# Altium PCB Windmill_Circuit_v2.1.PcbDoc (part 2 of 2)
Units mil, origin at the board's own origin, x right, y up, seen from the top; angles counter-clockwise.
Board outline 6875 x 6875 mil, 2 copper layers (Top Layer, Bottom Layer), stack 61.811 mil thick; 69 components, 43 nets, 209 pads, 194 vias.
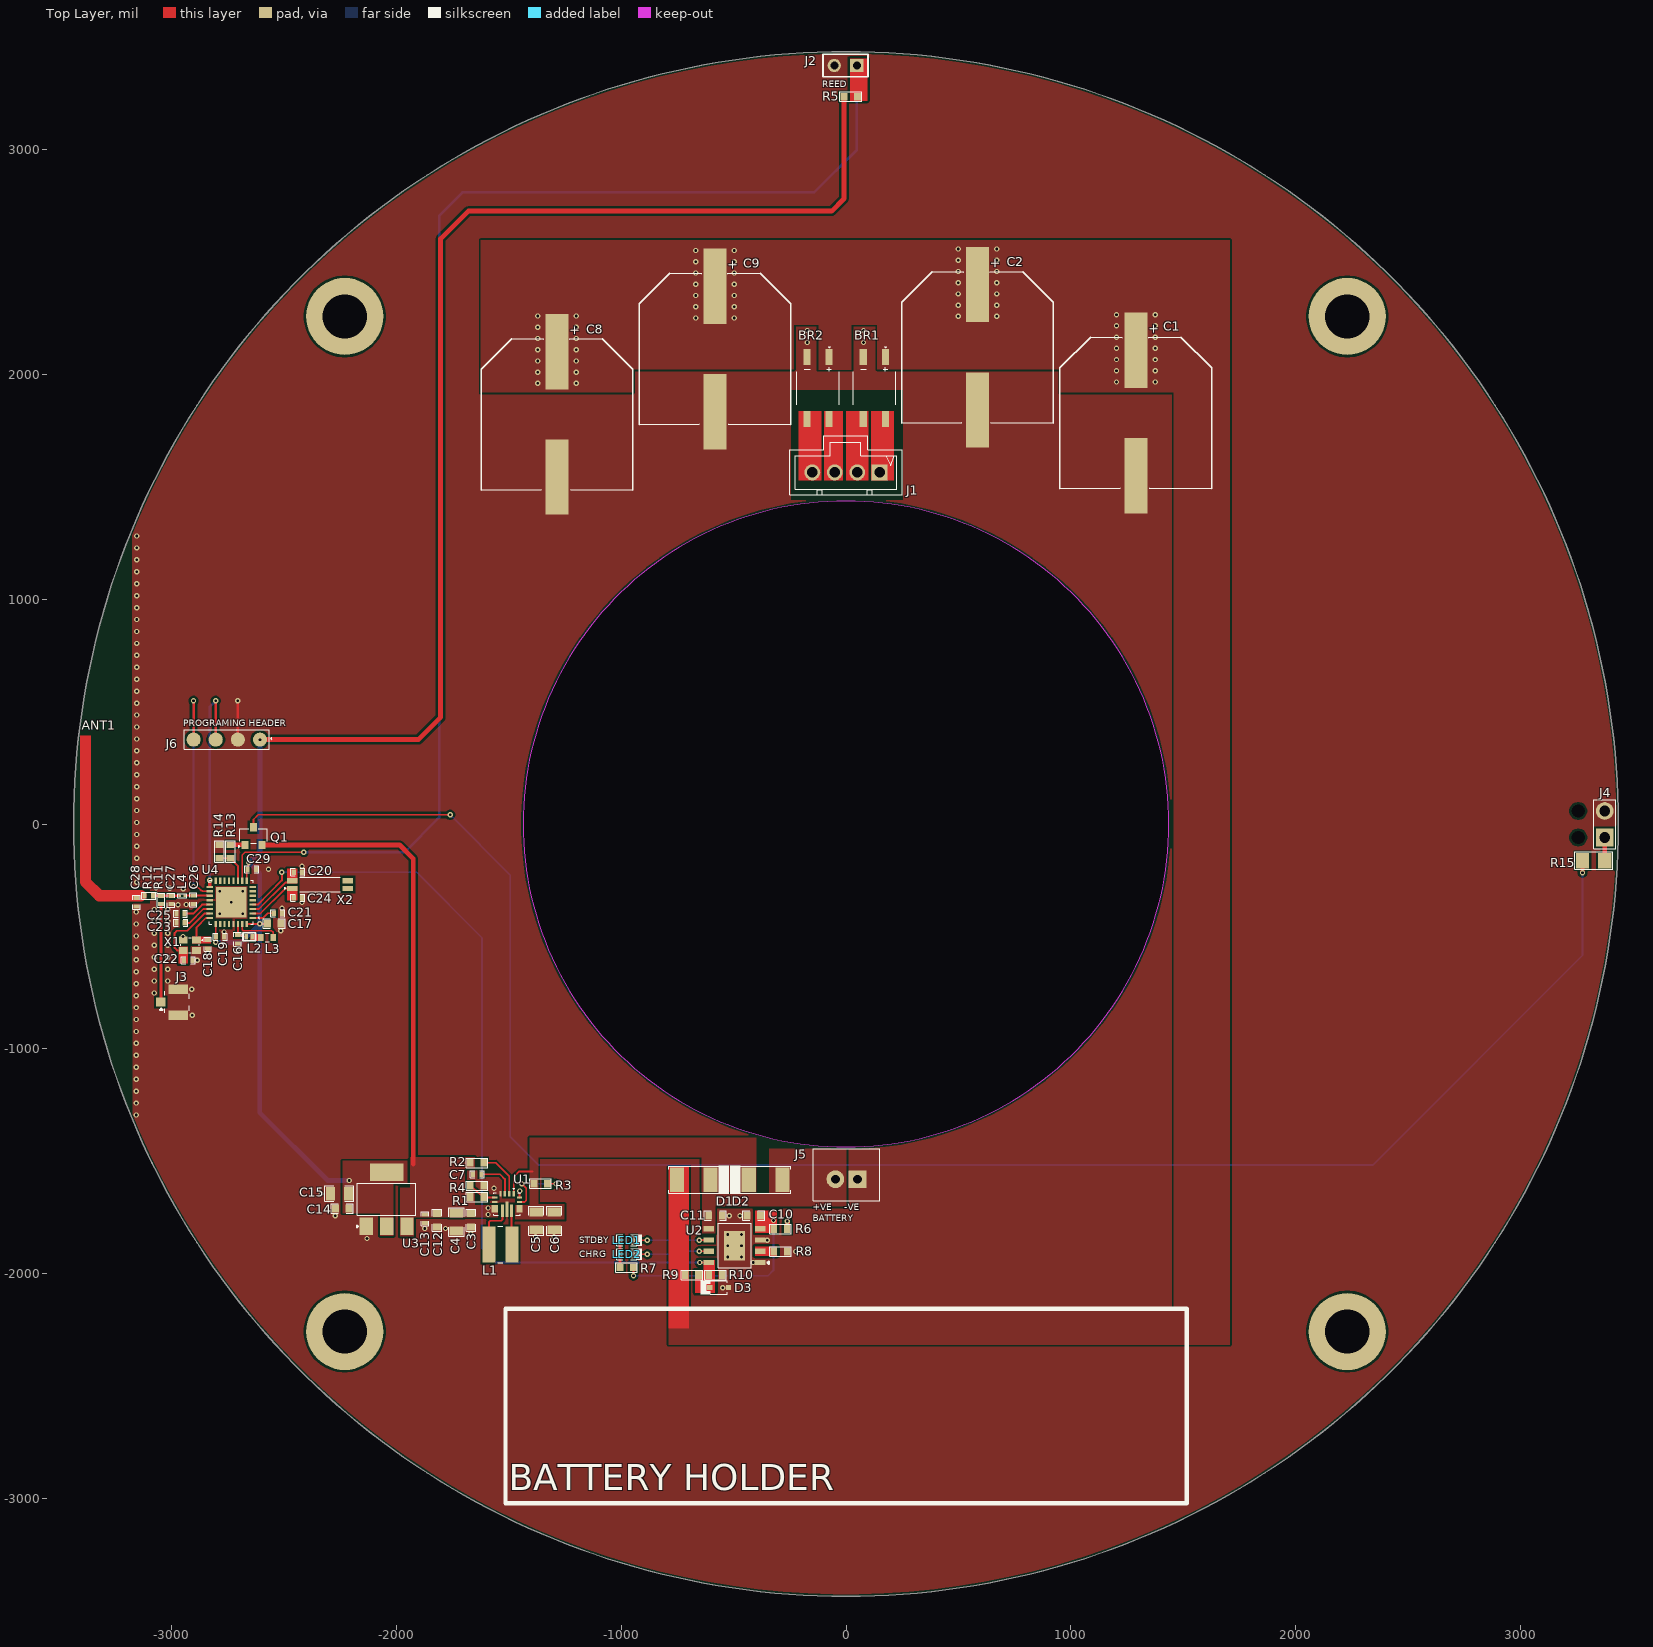
[diagram p0: Top Layer view]

## Part data (continued)
R5: library part RC0603JR-07330RL, "RES  SMD 330R 100 mW 0603", Case Code (Imperial)=0603, Case Code (Metric)=1608, LCSC Part Number=C105879, Manufacturer=Yageo, Max Operating Temperature=155°C, Max Power Dissipation=100mW, Min Operating Temperature=-55°C, Package Quantity=5000, Resistance Tolerance=5%, Resistor Type="Thick Film", Supplier Part Number 1=311-330GRCT-ND, Temperature Coefficient=100ppm/°C, Voltage Rating=50V, Case/Package=0603, Category="Chip SMD Resistors", Construction=Rectangular, Depth=0.8mm, Features="Moisture Resistant", Height=0.45mm, Item Type=Resistor, Lead Free="Lead Free", Length=1.6mm, Manufacturer Part Number=RC0603JR-07330RL, Military Standard=Not, Number of Pins=2, Number of Terminations=2, Packaging="Tape and Reel", Power Rating=100mW, Pricing 1="1=0.10000, 10=0.02000, 100=0.00800, 1000=0.00360, 2500=0.00312 (USD)", REACH SVHC="No SVHC", Resistance=330R, RoHS=Yes, RoHS Compliant=Yes, Series=RC, Size Code=0603, Stock 1=1074593, Supplier 1=Digi-Key, Termination=SMD/SMT, Tolerance=5%, Voltage Rating (DC)=50V, Width=0.8mm
R6: library part RL0603JR-070R47L, "RES 0.47 OHM 5% 1/10W 0603", LCSC Part Number=C705484, Manufacturer=Yageo, ComponentLink1Description=https://datasheet.ciiva.com/14983/pyu-rl-group-521-rohs-l-0-14983432.pdf?src-supplier=Digikey, ComponentLink1URL=https://datasheet.ciiva.com/14983/pyu-rl-group-521-rohs-l-0-14983432.pdf?src-supplier=Digikey, ComponentLink2Description=https://datasheet.ciiva.com/17055/pyu-rl-521-rohs-l-5-17055645.pdf?src-supplier=Future+Electronics, ComponentLink2URL=https://datasheet.ciiva.com/17055/pyu-rl-521-rohs-l-5-17055645.pdf?src-supplier=Future+Electronics, Item Type=Resistor, Manufacturer Part Number=RL0603JR-070R47L, Pricing="1=0.13, 10=0.044, 50=0.0392, 100=0.0347, 500=0.03264, 1000=0.02958 (USD)", RoHS=Yes, Stock=1845, Supplier=Digikey
R7: library part RC0603FR-071KL, "RES SMD 1K OHM 1% 1/10W 0603", Case Code (Imperial)=0603, Case Code (Metric)=1608, LCSC Part Number=C22548, Manufacturer=Yageo, Max Operating Temperature=155°C, Min Operating Temperature=-55°C, Power Rating=100mW, Resistance=1kR, Supplier Part Number 1=311-1.00KHRDKR-ND, Temperature Coefficient=100ppm/°C, Tolerance=1%, Voltage Rating=50V, Case/Package=0603, ComponentLink1Description=https://www.verical.com/server-webapp/html/getDatasheet?partID=409289&src-supplier=Verical, ComponentLink1URL=https://www.verical.com/server-webapp/html/getDatasheet?partID=409289&src-supplier=Verical, ComponentLink2Description=http://documents.rs-components.com/techlib://itc_doclist_GB.htm?stockno=5048928&src-supplier=RSComponents, ComponentLink2URL=http://documents.rs-components.com/techlib://itc_doclist_GB.htm?stockno=5048928&src-supplier=RSComponents, ComponentLink3Description=http://www.yageo.com/documents/recent/PYu-RC0603_51_RoHS_L_4.pdf?src-supplier=Avnet+Europe, ComponentLink3URL=http://www.yageo.com/documents/recent/PYu-RC0603_51_RoHS_L_4.pdf?src-supplier=Avnet+Europe, ComponentLink4Description=http://www.farnell.com/datasheets/2167052.pdf?src-supplier=Element14, ComponentLink4URL=http://www.farnell.com/datasheets/2167052.pdf?src-supplier=Element14, ComponentLink5Description=http://www.farnell.com/datasheets/1868787.pdf?src-supplier=Element14, ComponentLink5URL=http://www.farnell.com/datasheets/1868787.pdf?src-supplier=Element14, ComponentLink6Description=http://www.yageo.com/documents/recent/PYu-RC_Group_51_RoHS_L_2.pdf?src-supplier=Avnet, ComponentLink6URL=http://www.yageo.com/documents/recent/PYu-RC_Group_51_RoHS_L_2.pdf?src-supplier=Avnet, ComponentLink7Description=https://www.verical.com/server-webapp/html/getDatasheet?partID=404327&src-supplier=Verical, ComponentLink7URL=https://www.verical.com/server-webapp/html/getDatasheet?partID=404327&src-supplier=Verical, ComponentLink8Description=http://www.farnell.com/datasheets/443971.pdf?src-supplier=Element14, ComponentLink8URL=http://www.farnell.com/datasheets/443971.pdf?src-supplier=Element14, Composition="Thick Film", Contact Plating=Tin,Matte, Depth=0.8mm, Height=0.45mm, Item Type=Resistor, Lead Free="Lead Free", Length=1.6mm, Manufacturer Part Number=RC0603FR-071KL, Military Standard=Not, Packaging="Tape and Reel", Pricing 1="1=0.1, 10=0.023, 100=0.0094, 1000=0.0042, 2500=0.0037 (USD)", Radiation Hardening=No, REACH SVHC="No SVHC", Stock 1=21472395, Supplier 1=Digi-Key, Termination=SMD/SMT
R8: library part RC0603FR-072KL, "RES SMD 2K OHM 1% 1/10W 0603", Case Code (Imperial)=0603, Case Code (Metric)=1608, LCSC Part Number=C105576, Manufacturer=Yageo, Max Operating Temperature=155°C, Max Power Dissipation=100mW, Min Operating Temperature=-55°C, Package Quantity=1, Resistance=2kR, Supplier Part Number 1=311-2.00KHRCT-ND, Temperature Coefficient=100ppm/°C, Tolerance=1%, Voltage Rating=50V, Working Voltage=75V, Case/Package=0603, ComponentLink1Description=http://www.farnell.com/datasheets/2167052.pdf?src-supplier=Element14, ComponentLink1URL=http://www.farnell.com/datasheets/2167052.pdf?src-supplier=Element14, ComponentLink2Description=http://documents.rs-components.com/techlib://itc_doclist_GB.htm?stockno=5050139&src-supplier=RSComponents, ComponentLink2URL=http://documents.rs-components.com/techlib://itc_doclist_GB.htm?stockno=5050139&src-supplier=RSComponents, ComponentLink3Description=http://www.yageo.com/documents/recent/PYu-RC_Group_51_RoHS_L_10.pdf?src-supplier=Digi-Key, ComponentLink3URL=http://www.yageo.com/documents/recent/PYu-RC_Group_51_RoHS_L_10.pdf?src-supplier=Digi-Key, ComponentLink4Description=http://www.mouser.com/catalog/specsheets/RC0603.pdf?src-supplier=Mouser, ComponentLink4URL=http://www.mouser.com/catalog/specsheets/RC0603.pdf?src-supplier=Mouser, Composition="Thick Film", Depth=0.8mm, Features="Moisture Resistant", Height=0.45mm, Lead Free="Lead Free", Length=1.6mm, Manufacturer Part Number=RC0603FR-072KL, Military Standard=Not, Number of Pins=2, Number of Terminations=2, Packaging="Tape and Reel", Power Rating=100mW, Pricing 1="1=0.1, 10=0.023, 100=0.0094, 1000=0.00421, 2500=0.00366 (USD)", REACH SVHC="No SVHC", Stock 1=8782961, Supplier 1=Digi-Key, Termination=SMD/SMT, Voltage Rating (DC)=50V, Width=0.031inch
R9: library part RT0603BRD0733KL, "RES SMD 33K OHM 0.1% 1/10W 0603", Case Code (Imperial)=0603, Case Code (Metric)=1608, LCSC Part Number=C705768, Manufacturer=Yageo, Max Operating Temperature=125°C, Max Power Dissipation=100mW, Min Operating Temperature=-55°C, Package Quantity=5000, Resistance=33kR, Resistor Type="Thin Film", Temperature Coefficient=25ppm/°C, Voltage Rating=75V, Voltage Rating (DC)=50V, Case/Package=0603, Category="Chip SMD Resistors", ComponentLink1Description=https://datasheet.ciiva.com/2585/pyu-rt-1-to-0-05-rohs-l-4-2585891.pdf?src-supplier=Digi-Key, ComponentLink1URL=https://datasheet.ciiva.com/2585/pyu-rt-1-to-0-05-rohs-l-4-2585891.pdf?src-supplier=Digi-Key, ComponentLink2Description=https://datasheet.ciiva.com/12810/pyu-rt-1-to-0-05-rohs-l-4-12810117.pdf?src-supplier=Mouser, ComponentLink2URL=https://datasheet.ciiva.com/12810/pyu-rt-1-to-0-05-rohs-l-4-12810117.pdf?src-supplier=Mouser, ComponentLink3Description=https://datasheet.ciiva.com/8889/pyu-rt-1-to-0-05-rohs-l-4-8889590.pdf?src-supplier=Avnet, ComponentLink3URL=https://datasheet.ciiva.com/8889/pyu-rt-1-to-0-05-rohs-l-4-8889590.pdf?src-supplier=Avnet, Construction=Rectangular, Contact Plating=Tin,Matte, Depth=0.8mm, Features="Moisture Resistant", Height=0.022inch, Lead Free="Lead Free", Length=1.6mm, Manufacturer Part Number=RT0603BRD0733KL, Military Standard=Not, Number of Terminations=2, Packaging="Tape and Reel", Power Rating=100mW, Pricing 1="1=0.30860 (USD)", Radiation Hardening=No, RoHS=Yes, RoHS Compliant=Yes, Series=RT, Size Code=0603, Stock 1=2, Supplier 1="Arrow Electronics", Supplier Part Number 1=RT0603BRD0733KL, Termination=SMD/SMT, Weight=7.1E-05oz, Width=0.031inch
R11: library part RC0402FR-070RL, "RES 0 OHM JUMPER 1/16W 0402", Case Code (Imperial)=0402, Case Code (Metric)=1005, LCSC Part Number=C106231, Manufacturer=Yageo, Max Operating Temperature=155°C, Max Power Dissipation=63mW, Min Operating Temperature=-55°C, Power Rating=62.5mW, Resistance=0R, Resistor Type="Thick Film", Supplier Part Number 1=603-RC0402FR-070RL, Temperature Coefficient=200ppm/°C, Tolerance=1%, Voltage Rating=50V, Case/Package=0402, ComponentLink1Description=https://datasheet.ciiva.com/8896/pyu-rc0402-51-rohs-l-6-8896149.pdf?src-supplier=Avnet, ComponentLink1URL=https://datasheet.ciiva.com/8896/pyu-rc0402-51-rohs-l-6-8896149.pdf?src-supplier=Avnet, ComponentLink2Description=https://datasheet.ciiva.com/16790/pyu-rc0402-51-rohs-l-6-r-16790444.pdf?src-supplier=Future+Electronics, ComponentLink2URL=https://datasheet.ciiva.com/16790/pyu-rc0402-51-rohs-l-6-r-16790444.pdf?src-supplier=Future+Electronics, Contact Plating=Tin,Matte, Features="Moisture Resistant", Height=0.35mm, Item Type=Resistors, Lead Free="Lead Free", Length=1mm, Manufacturer Part Number=RC0402FR-070RL, Mount="Surface Mount", Number of Terminations=2, Packaging="Tape and Reel", Pricing 1="1=0.10000, 10=0.01400, 50=0.01400, 100=0.00600, 1000=0.00300, 5000=0.00200, 10000=0.00100 (USD)", Radiation Hardening=No, RoHS=Yes, RoHS Compliant=Yes, Series=RC, Size Code=0402, Stock 1=8556842, Supplier 1=Mouser, Termination=SMD/SMT, Width=0.5mm
R12: library part RC0402FR-070RL, "RES 0 OHM JUMPER 1/16W 0402", Case Code (Imperial)=0402, Case Code (Metric)=1005, LCSC Part Number=C106231, Manufacturer=Yageo, Max Operating Temperature=155°C, Max Power Dissipation=63mW, Min Operating Temperature=-55°C, Power Rating=62.5mW, Resistor Type="Thick Film", Supplier Part Number 1=603-RC0402FR-070RL, Temperature Coefficient=200ppm/°C, Tolerance=1%, Voltage Rating=50V, Case/Package=0402, ComponentLink1Description=https://datasheet.ciiva.com/8896/pyu-rc0402-51-rohs-l-6-8896149.pdf?src-supplier=Avnet, ComponentLink1URL=https://datasheet.ciiva.com/8896/pyu-rc0402-51-rohs-l-6-8896149.pdf?src-supplier=Avnet, ComponentLink2Description=https://datasheet.ciiva.com/16790/pyu-rc0402-51-rohs-l-6-r-16790444.pdf?src-supplier=Future+Electronics, ComponentLink2URL=https://datasheet.ciiva.com/16790/pyu-rc0402-51-rohs-l-6-r-16790444.pdf?src-supplier=Future+Electronics, Contact Plating=Tin,Matte, Features="Moisture Resistant", Height=0.35mm, Item Type=Resistors, Lead Free="Lead Free", Length=1mm, Manufacturer Part Number=RC0402FR-070RL, Mount="Surface Mount", Number of Terminations=2, Packaging="Tape and Reel", Pricing 1="1=0.10000, 10=0.01400, 50=0.01400, 100=0.00600, 1000=0.00300, 5000=0.00200, 10000=0.00100 (USD)", Radiation Hardening=No, Resistance=0R, RoHS=Yes, RoHS Compliant=Yes, Series=RC, Size Code=0402, Stock 1=8556842, Supplier 1=Mouser, Termination=SMD/SMT, Width=0.5mm
R13: library part RC0603FR-074R7L, "RES 4.7 OHM 1% 1/10W 0603", Case Code (Imperial)=0603, Case Code (Metric)=1608, LCSC Part Number=C137705, Manufacturer=Yageo, Max Operating Temperature=155°C, Max Power Dissipation=100mW, Min Operating Temperature=-55°C, Package Quantity=5000, Resistance Tolerance=1%, Resistor Type="Thick Film", Supplier Part Number 1=3598901, Temperature Coefficient=200ppm/°C, Voltage Rating=50V, Case/Package=0603, Category="Chip SMD Resistors", ComponentLink1Description=https://datasheet.ciiva.com/46440/1868787-46440910.pdf?src-supplier=Element14, ComponentLink1URL=https://datasheet.ciiva.com/46440/1868787-46440910.pdf?src-supplier=Element14, ComponentLink2Description=https://datasheet.ciiva.com/12555/rc0603-272842-12555071.pdf?src-supplier=Mouser, ComponentLink2URL=https://datasheet.ciiva.com/12555/rc0603-272842-12555071.pdf?src-supplier=Mouser, Features="Moisture Resistant", Height=0.45mm, Item Type=Resistor, Lead Free="Lead Free", Length=1.6mm, Manufacturer Part Number=RC0603FR-074R7L, Number of Terminations=2, Packaging="Tape and Reel", Pins=2, Power Rating=100mW, Pricing 1="5000=0.0036, 25000=0.0034, 125000=0.0032, 250000=0.0031, 750000=0.0029 (USD)", Reach SVHC Compliant=Unknown, RoHS=Yes, Series=RC, Stock 1=160000, Supplier 1="Future Electronics", Termination=SMD/SMT, Tolerance=1%, Voltage Rating (DC)=50V, Width=0.8mm
R15: library part RC1206FR-078R2L, "RES 8.2 OHM 1% 1/4W 1206", LCSC Part Number=C488973, Manufacturer=Yageo, Supplier Part Number=311-8.20FRCT-ND, Voltage Rating (AC)=200V, ComponentLink1Description=https://datasheet.ciiva.com/11809/0900766b80c6630a-11809543.pdf?src-supplier=Rs, ComponentLink1URL=https://datasheet.ciiva.com/11809/0900766b80c6630a-11809543.pdf?src-supplier=Rs, ComponentLink2Description=https://datasheet.ciiva.com/2460/pyu-rc1206-51-rohs-l-4-2460129.pdf?src-supplier=Digikey, ComponentLink2URL=https://datasheet.ciiva.com/2460/pyu-rc1206-51-rohs-l-4-2460129.pdf?src-supplier=Digikey, ComponentLink3Description=https://datasheet.ciiva.com/2460/pyu-rc1206-51-rohs-l-4-2460130.pdf?src-supplier=Digikey, ComponentLink3URL=https://datasheet.ciiva.com/2460/pyu-rc1206-51-rohs-l-4-2460130.pdf?src-supplier=Digikey, ComponentLink4Description=https://datasheet.ciiva.com/2460/pyu-rc1206-51-rohs-l-4-2460131.pdf?src-supplier=Digikey, ComponentLink4URL=https://datasheet.ciiva.com/2460/pyu-rc1206-51-rohs-l-4-2460131.pdf?src-supplier=Digikey, Item Type=Resistors, Manufacturer Part Number=RC1206FR-078R2L, Pricing="1=0.13, 10=0.064, 50=0.0426, 100=0.0364, 500=0.02612, 1000=0.023 (USD)", RoHS=Yes, Stock=39560, Supplier=Digikey
U1: "IC REG BCK BST ADJ 3.6A 15VQFN", LCSC Part Number=C109322, Manufacturer="Texas Instruments", Supplier Part Number=595-TPS63070RNMR, Category="Voltage Regulators - Switching", ComponentLink1Description=http://www.ti.com/lit/ds/symlink/tps63070.pdf?src-supplier=Digi-Key, ComponentLink1URL=http://www.ti.com/lit/ds/symlink/tps63070.pdf?src-supplier=Digi-Key, ComponentLink2Description=http://www.ti.com/lit/ds/symlink/tps63070.pdf?src-supplier=Farnell, ComponentLink2URL=http://www.ti.com/lit/ds/symlink/tps63070.pdf?src-supplier=Farnell, Item Type=IC, Manufacturer Part Number=TPS63070RNMR, Pricing="1=2.7, 10=2.29, 50=2.29, 100=1.99, 1000=1.43, 10000=1.21 (USD)", RoHS=Yes, Stock=55982, Supplier=Mouser
U2: "3.7V~6.5V Lithium-ion 1 1000mA ESOP-8 Battery Management ROHS", LCSC Part Number=C725790, Manufacturer="UMW(Youtai Semiconductor Co., Ltd.)", Package=ESOP-8, ComponentLink1Description=LCSC, ComponentLink1URL=https://www.lcsc.com/product-detail/Battery-Management_UMW-Youtai-Semiconductor-Co-Ltd-TP4056_C725790.html?s_z=n_TP4056, Item Type=IC, Manufacturer Part Number=TP4056
U3: "15V 1.3V @ 800mA Fixed 3.3V SOT-223 Linear Voltage Regulators (LDO) ROHS", LCSC Part Number=C92102, Manufacturer="Diodes Incorporated", Package=SOT-223, ComponentLink1Description=LCSC, ComponentLink1URL=https://lcsc.com/product-detail/Linear-Voltage-Regulators-LDO_Diodes-Incorporated-AZ1117CH-3-3TRG1_C92102.html, Item Type=IC, Manufacturer Part Number=AZ1117CH-3.3TRG1
U4: "IC RF TXRX+MCU BLE 32QFN", LCSC Part Number=C519278, Manufacturer="Nordic Semiconductor", Item Type=IC, Manufacturer Part Number=NRF52810-QCAA-R, Pricing="1=2.26, 100=1.92, 500=1.67, 1000=1.52 (USD)", RoHS=Yes, RoHS Compliant=Yes, Stock=11942, Supplier=Digikey
X1: library part Q22FA12800025, "CRYSTAL 32.0000MHZ 8PF SMD", LCSC Part Number=C187794, Manufacturer=Epson, ComponentLink1Description=http://ndap3-net.ebz.epson.co.jp/w/www/PDFS/epdoc_qd.nsf/85a4e2c523a1f89349257068002f9e30/255cb2884010a1f9492571f0004c7d72/$FILE/FA-128_E09X.pdf?src-supplier=Newark, ComponentLink1URL=http://ndap3-net.ebz.epson.co.jp/w/www/PDFS/epdoc_qd.nsf/85a4e2c523a1f89349257068002f9e30/255cb2884010a1f9492571f0004c7d72/$FILE/FA-128_E09X.pdf?src-supplier=Newark, ComponentLink2Description=http://www.farnell.com/datasheets/1734615.pdf?src-supplier=Newark, ComponentLink2URL=http://www.farnell.com/datasheets/1734615.pdf?src-supplier=Newark, Item Type=Crystal, Manufacturer Part Number=Q22FA12800025, Pricing="250=0.511 (GBP)", RoHS=Yes, Stock=250, Supplier=Farnell
X2: library part Q13MC14620001, "32.768kHz 7pF ±20ppm MC-146 Crystals ROHS", LCSC Part Number=C3013800, Manufacturer="Seiko Epson", Package=MC-146, ComponentLink1Description=LCSC, ComponentLink1URL=https://www.lcsc.com/product-detail/Crystals_Seiko-span-style-background-color-ff0-Epson-span-Q13MC14620001_C3013800.html, Item Type=Crystals, Manufacturer Part Number=Q13MC14620001

## Free pads (board coordinates)
  round 343.31 hole 196.85: MH(-2231,-2259) MH(-2231,2259) MH(2231,-2259) MH(2231,2259)

## Via types
v1: diameter 23.62, hole 11.81, Top Layer to Bottom Layer, tented both sides, 191 vias
v2: diameter 23.62, hole 11.81, Top Layer to Bottom Layer, 3 vias

## Nets (pads, with @x,y where several pads share a name; then routed paths per layer and width w, separated by ;. In a path a pad name is that pad's centre, name@x,y a point inside that pad or via, vN(x,y) a via of type N, cw(c..) or ccw(c..) an arc to the next point about the centre after c; other vN are vias at no path point)
3V3: C14.2 C15.2 C17.2 C19.2 C29.2 J6.1 R5.2 U3.2 U3.4 U4.9 U4.25 U4.32 | length 8015.5
  Top Layer w8: v1(-2805,-527) U4.25 ; U4.32 -2578.71,-444.71 C17.2@-2575,-441 ; U4.9 -2667.24,-202 -2660.19,-194.95 -2660.19,-173.19 v1(-2658,-171)
  Top Layer w22: v1(-2608.36,375.5) -1903.5,375.5 -1804,475 -1804,2605 -1681,2728 -64,2728 -9,2783 R5.2
  Bottom Layer w22: v1(-2805,-527) -2691.7,-527 v1(-2609.19,-444.49) ; v1(-2658,-171) -2656.46,-171 -2608.36,-122.9 v1(-2608.36,375.5) ; v1@-2657.93,-171 -2609.19,-219.74 v1(-2609.19,-444.49) ; v1(-2211,-1587) -2307,-1587 -2609.19,-1284.81 v1(-2609.19,-444.49)
5V: C3.2 C4.2 C12.2 C13.2 Q1.2 R1.2 R2.2 R6.1 U1.7_8 U3.3 | length 2092.6
  Top Layer w22: Q1.2 -1986.63,-93.37 -1926,-154 -1926,-1514 ; R6.1 v2(-261,-1768)
  other v1: -1593,-1738 -1593,-1709
12V: BR1.1 BR2.1 C1.1 C2.1 C8.1 C9.1 D1.2 R9.1
  other v1: -1372,1961 -1200,1961 1204,1967 1376,1967 -1372,2011 -1200,2011 1204,2017 1376,2017 -1372,2061 -1200,2061 1204,2067 1376,2067 -1372,2111 -1200,2111 1204,2117 1376,2117 -1372,2161 -1200,2161 1204,2167 1376,2167 -1372,2211 -1200,2211 1204,2217 1376,2217 -669,2252.27 -497,2252.27 499,2259.27 671,2259.27 -1372,2261 -1200,2261 1204,2267 1376,2267 -669,2302.27 -497,2302.27 499,2309.27 671,2309.27 -669,2352.27 -497,2352.27 499,2359.27 671,2359.27 -669,2402.27 -497,2402.27 499,2409.27 671,2409.27 -669,2452.27 -497,2452.27 499,2459.27 671,2459.27 -669,2502.27 -497,2502.27 499,2509.27 671,2509.27 -669,2552.27 -497,2552.27 499,2559.27 671,2559.27
12V#: C5.2 C6.2 D1.1 D2.1 R3.1 U1.1 U1.12_13 | length 170.3
  Top Layer w8: U1.1 -1479,-1571 -1454,-1546 -1394,-1546
ANT: C28.2 R12.2
BAT+: C11.2 D2.2 J5.2 U2.5
BATT_CHRG: D3.2 R9.2 R10.2 U2.8 U4.4 | length 3640.5
  Top Layer w8: U4.4 -2618.68,-358.69 -2567.27,-307.27 -2510.81,-250.81 v1(-2510.81,-215) ; v1@-650.91,-1951.91 U2.8
  Top Layer w12: v1(-651,-1952) v1@-650.91,-1951.91
  Bottom Layer w8: v1(-2510.81,-215) -2506,-215 -1911,-215 -1620,-506 -1620,-1890 -1558,-1952 v1(-651,-1952)
DEC1: C21.2 U4.1 | length 101.9
  Top Layer w8: U4.1 -2593.55,-417.74 -2572.81,-397 C21.2
DEC2: C25.2 U4.21 | length 128.2
  Top Layer w8: C25.2 -2906,-399 -2865.68,-358.69 U4.21
DEC3: C23.1 U4.22 | length 136.5
  Top Layer w8: C23.1 -2921.54,-440 -2859.91,-378.37 U4.22
DEC4: C16.1 L2.1 U4.30 | length 91.5
  Top Layer w8: U4.30 -2706.61,-493.11 C16.1 -2692.5,-494.5 -2685.44,-501.56 L2.1
GND: BR1.2 BR2.2 C1.2 C2.2 C3.1 C4.1 C5.1 C6.1 C7.1 C8.2 C9.2 C10.1 C11.1 C12.1 C13.1 C14.1 C15.1 C16.2 C17.1 C18.2 C19.1 C20.2 C21.1 C22.2 C23.2 C24.2 C25.1 C26.1 C27.2 C28.1 C29.1 D3.1 J2.2 J3.2 J3.3 J4.2 J5.1 J6.2 R4.1 R8.1 R10.1 R14.1 U1.4 U1.6 U1.10 U1.15 U2.1 U2.3 U2.9 U3.1 U4.20 U4.29 U4.33 X1.2 X1.4 | length 215.6
  Top Layer w8: U1.15 -1453.41,-1629.59 -1455,-1628 -1454.46,-1627.46 -1453.3,-1627.46 -1452.28,-1628.48 v1(-1452.28,-1633.32)
  Top Layer w12: J6.2 v1@-2706.79,547.64
  other v1: -548,-2064 -412.98,-1951.72 -527,-1927 -465,-1927 -224,-1903 -527,-1877 -465,-1877 -350,-1852.09 -2131.67,-1845.19 -1381.67,-1837.19 -1299.67,-1837.19 -527,-1827 -465,-1827 -1669.67,-1823.19 -1874.67,-1800.19 -1782.67,-1800.19 -2273.67,-1743.19 -520,-1743 -472,-1743 -2337,-1647 -1567,-1621 -3159,-1295.33 -3159,-1242.19 -3159,-1189.05 -3159,-1135.92 -3159,-1082.78 -3159,-1029.64 -3159,-976.5 -3159,-923.37 -3159,-870.23 -2910,-851 -3159,-817.09 -3159,-763.96 -3079,-752.14 -2912,-736 -3159,-710.82 -3079,-699 -3019,-699 -3159,-657.68 -3079,-645.86 -3019,-645.86 -2888,-606 -3159,-604.55 -3079,-592.73 -3019,-592.73 -2841,-573 -2709,-561 -3159,-551.41 -3079,-539.59 -3019,-539.59 -2951,-501 -3159,-498.27 -3079,-486.45 -3019,-486.45 -2768,-480.3 -2515.19,-474.49 -3159,-445.14 -3079,-433.32 -3019,-433.32 -2787,-399 -2685.27,-399 -3159,-392 -3079,-380.18 -3019,-380.18 -2510,-375.5 -2973,-359 -2936,-358 -2736.13,-348.84 -2421,-349.5 -2787,-299 -2685.27,-299 -2949.28,-288.09 -3010.19,-286.29 -3071.11,-284.5 -3157,-259 -3157,-205.86 -2570,-201 -2421,-188 -3157,-152.73 -3157,-99.59 -3157,-46.45 -3157,6.68 -3157,59.82 -3157,112.96 -3157,166.09 -3157,166.09 -3157,219.23 -3157,272.37 -3157,325.5 -3157,378.64 -3157,431.78 -3157,484.92 -3157,538.05 -2707.15,548 -3157,591.19 -3157,644.33 -3157,697.46 -3157,750.6 -3157,803.74 -3157,856.87 -3157,910.01 -3157,963.15 -3157,1016.28 -3157,1069.42 -3157,1122.56 -3157,1175.69 -3157,1228.83 -3157,1281.97 -172,2143 78,2143 -172,2196.14 78,2196.14
LED_STATE: R13.1 R14.2 U4.11 | length 162.8
  Top Layer w8: R14.2 R13.1 -2706.61,-185.39 U4.11
NetBR1_3: BR1.3 J1.2
NetBR1_4: BR1.4 J1.1
NetBR2_3: BR2.3 J1.4
NetBR2_4: BR2.4 J1.3
NetC7_2: C7.2 U1.3 | length 178.4
  Top Layer w8: C7.2 -1540.03,-1558.97 -1518.37,-1580.63 U1.3
NetC10_2: C10.2 R6.2 R7.1 U2.4 | length 892.9
  Top Layer w8: v1(-946,-2011) R7.1
  Bottom Layer w8: v1(-946,-2011) -347,-2011 -323,-1987 v1(-323,-1765)
NetC26_2: C26.2 L4.1 U4.19
NetJ3_1: J3.1 R11.2 | length 436
  Top Layer w12: J3.1 R11.2
NetJ4_1: J4.1 R15.1 | length 127.4
  Top Layer w20: J4.1@3377,-60.06 3377,-157 3383,-163 R15.1@3383,-185
NetL1_1: L1.1 U1.11 | length 151.1
  Top Layer w8: U1.11 -1488.84,-1870.16 L1.1
NetL1_2: L1.2 U1.9 | length 204.3
  Top Layer w8: L1.2 -1589.36,-1773.64 -1590,-1773 -1583,-1766 -1535,-1766 -1528.21,-1759.21 U1.9
NetL2_2: L2.2 L3.1
NetL3_2: L3.2 U4.31 | length 191
  Top Layer w8: U4.31 -2686.92,-471.08 -2683,-475 -2557,-475 -2549.44,-482.56 L3.2
NetLED1_1: LED1.1 LED2.1 R7.2 | length 120.2
  Top Layer w12: R7.2 -1005.53,-1972.53 LED2.1 LED1.1
NetLED1_2: LED1.2 U2.6 | length 336.4
  Top Layer w8: LED1.2 v1(-884,-1853) ; v1(-653,-1852) -652.91,-1851.91 U2.6
  Bottom Layer w8: v1(-884,-1853) -654,-1853 v1(-653,-1852)
NetLED2_2: LED2.2 U2.7 | length 341.3
  Top Layer w8: LED2.2 v1(-884,-1915) ; v1@-652.91,-1901.91 U2.7
  Bottom Layer w8: v1(-884,-1915) -749,-1915 -736,-1902 v1(-653,-1902)
NetQ1_1: Q1.1 R13.2 | length 66.2
  Top Layer w20: R13.2 -2675.77,-92 Q1.1
NetQ1_3: Q1.3 R15.2 | length 8094
  Top Layer w8: Q1.3 -2637,20 -2616.26,40.74 v2(-1762,40.74)
  Top Layer w20: v2(3278,-217) R15.2
  Bottom Layer w8: v2(-1762,40.74) -1494,-227.26 -1494,-1392 -1368,-1518 2344,-1518 3278,-584 v2(3278,-217)
NetR1_1: R1.1 R4.2 U1.5 | length 127.8
  Top Layer w8: R4.2 R1.1 -1610.27,-1662.64 U1.5
NetR2_1: R2.1 U1.2 | length 215.9
  Top Layer w8: R2.1 -1559,-1508 -1498.69,-1568.31 -1498.69,-1624.31 U1.2
NetR3_2: R3.2 U1.14 | length 305.8
  Top Layer w8: U1.14 -1430.32,-1682.32 -1423,-1675 -1423,-1621 v1(-1443,-1601) ; R3.2 -1328.91,-1601 v1(-1291,-1601)
  Bottom Layer w8: v1(-1443,-1601) v1(-1291,-1601)
NetR8_2: R8.2 U2.2
REED_SW: J2.1 R5.1 U4.10 | length 6094.6
  Top Layer w8: U4.10 -2686.92,-137.92 -2675,-126 -2413.18,-126 v1(-2413,-126.18)
  Bottom Layer w12: v1(-2413,-126.18) -2412.82,-126 -1965,-126 -1811,28 -1811,2707 -1706.5,2811.5 -141.5,2811.5 48,3001 J2.1
RF: C27.1 L4.2 R11.1 R12.1 | length 118.5
  Top Layer w12: R12.1@-3084.5,-319 -3009.51,-319 -3007.51,-319 L4.2@-2966.01,-319
SWDCLK: J6.3 U4.17 | length 981.1
  Top Layer w12: J6.3 v1@-2805.21,547.64
  Bottom Layer w12: v1(-2832,-250) -2832,521.57 v1(-2805.57,548)
SWDIO: J6.4 U4.18 | length 1077.6
  Top Layer w8: v1(-2904,-278) cw(c-2904,-316.63) -2876.69,-289.31 -2872,-294 ccw(c-2858.41,-280.41) -2858.41,-299.63 U4.18
  Top Layer w12: J6.4 v1@-2903.64,547.64
  Bottom Layer w10: v1(-2904,-278) v1@-2904,549
  other v1: -2904,548
XC1: C22.1 U4.23 X1.3 | length 302.2
  Top Layer w8: X1.3 -2977.38,-562.62 -2988.38,-551.62 -2988.38,-485.38 -2978.19,-475.19 -2931.28,-475.19 -2854.14,-398.06 U4.23
XC2: C18.1 U4.24 X1.1 | length 131.4
  Top Layer w8: X1.1 -2890.47,-459.84 -2848.37,-417.74 U4.24
XL1: C20.1 U4.2 X2.1 | length 221.1
  Top Layer w8: U4.2 -2606.06,-398.06 -2495.43,-287.43 -2482.43,-287.43 X2.1
XL2: C24.1 U4.3 X2.4 | length 227.6
  Top Layer w8: U4.3 -2612.91,-378.37 -2494.36,-259.81 -2472.81,-259.81 X2.4
pads on no net: J4.MH1 J4.MH2 U4.5 U4.6 U4.7 U4.8 U4.12 U4.13 U4.14 U4.15 U4.16 U4.26 U4.27 U4.28 X2.2 X2.3

## Polygon pours and split planes (outlines as drawn)
5V on Top Layer "5V_L01_P013" (solid, remove dead copper, pour order 13): -1985,-1835 -1923,-1835 -1923,-1750 -1550,-1750 -1550,-1697 -1643,-1697 -1652,-1697 -1652,-1637 -1697,-1637 -1697,-1533 -1652,-1533 -1652,-1483 -1939,-1483 -1939,-1619 -1985,-1619 -1985,-1751
GND on Top Layer "GND_L01_P011" (solid, remove dead copper, pour order 11): 0,-3437.5 cw(c0,0) -3437.5,0 cw(c0,0) 0,3437.5 cw(c0,0) 3437.5,0 cw(c0,0)
BAT+ on Top Layer "BAT+_L01_P000" (solid, remove dead copper, pour order 0): 2,-1498 2,-1702 -583,-1702 -583,-1822 -640,-1822 -640,-1648 -341,-1648 -341,-1446 2,-1446
12V# on Top Layer "12V#_L01_P001" (solid, remove dead copper, pour order 1): -1408,-1696 -1472,-1696 -1472,-1760 -1253,-1760 -1253,-1692 -1370,-1692 -1370,-1483 -642,-1483 -642,-1640 -400,-1640 -400,-1396 -1408,-1396
3V3 on Top Layer "3V3_L01_P003" (solid, remove dead copper, pour order 3): -2014,-1833 -2073,-1833 -2073,-1732 -2240,-1732 -2240,-1499 -1952,-1499 -1952,-1599 -2014,-1599
12V on Top Layer "12V_L01_P004" (solid, remove dead copper, pour order 4): 24,2223 24,2022 -122,2022 -122,2223 -232,2223 -232,2024 -949,2024 -949,1921 -1625,1921 -1625,2598 1708,2598 1708,1909 1708,-2317 -789,-2317 -789,-2164 1459,-2164 1459,1921 954,1921 954,2024 140,2024 140,2223
5V on Bottom Layer "5V_L02_P014" (solid, remove dead copper, pour order 14): -1602.8,-1698.2 -1602.8,-1751 -280,-1751 -280,-1822 -241,-1822 -241,-1702 -241,-1697 -1603,-1697
GND on Bottom Layer "GND_L02_P012" (solid, remove dead copper, pour order 12): 0,-3437.5 cw(c0,0) -3437.5,0 cw(c0,0) 0,3437.5 cw(c0,0) 3437.5,0 cw(c0,0)
12V on Bottom Layer "12V_L02_P008" (solid, remove dead copper, pour order 8): -1629,2391 -1629,1918 -228,1918 -228,2235 248,2235 248,1918 1736,1918 1736,2647 -1629,2647

## Other copper
Top Layer:
  region net ANT: -3359.99,393.73 -3409.98,393.73 -3409.98,364.03 -3359.99,364.03
  region net NetBR2_3: -109,1839 -211,1839 -211,1528 -109,1528
  region net NetBR2_4: -13,1839 -99,1839 -99,1528 -13,1528
  rectangle net NetBR1_3: -1,1528 101,1839
  rectangle net NetBR1_4: 112,1528 214,1839
  rectangle net XC2: -2910,-532 -2827,-500
  rectangle net XC1: -2970,-621 -2929,-546
  rectangle net NetL2_2: -2650,-521 -2592,-489
  rectangle net 12V: -789,-2246 -698,-1527
  rectangle net BATT_CHRG: -634,-2087 -582,-1940
  rectangle net BATT_CHRG: -671,-2087 -582,-1987
  rectangle net NetR8_2: -405,-1922 -306,-1880
  rectangle net NetC10_2: -405,-1820 -306,-1720
  rectangle net REED_SW: 17,3219 95,3406
  rectangle net XL1: -2489,-340.43 -2441,-275.43
  rectangle net XL2: -2489,-264 -2441,-199
  rectangle net SWDCLK: -2840,-279.94 -2824,-240
  rectangle net NetC26_2: -2947.35,-322.83 -2822.22,-314.83
  pour cut-out: -1447,-1788 -1447,-1959 -1626,-1959 -1626,-1788
  pour cut-out: 254,1933 254,1442 -246,1442 -246,1933
  pour cut-out: -3175.83,-280 -3096.17,-280 -3096.17,-354 -3175.83,-354
Bottom Layer:
  pour cut-out: -248,1442 254,1442 254,1667 -248,1667
Multi-Layer:
  pour cut-out: -3487.26,-1324 -3174.92,-1324 -3177.1,1315 -3487,1315

## Silkscreen, mask and mechanical layers (free items; w line width, h text height)
Top Overlay:
  lines w5: -3091,-1508 -3089,-1510
  lines w19.68: -1515.46,-3023.68 1516.04,-3023.68 1516.04,-2157.54 -1515.46,-2157.54 -1515.46,-3023.68
  text "REED" at -104.92,3267.99 h50
  text "PROGRAMING HEADER" at -2949,423.17 h50
  text "+VE" at -147.74,-1731.01 h50
  text "-VE" at -6.71,-1731.01 h50
  text "BATTERY" at -147.74,-1780.01 h50
  text "STDBY" at -1187.92,-1878.1 h50
  text "CHRG" at -1187.92,-1939.77 h50
  text "BATTERY HOLDER" at -1500,-3004.66 h200
Fabrication_Layer:
  drawing of 191 lines, arcs and shapes, not listed
  text "Layer" at 4066.34,1789 h60
  text "Name" at 4476.26,1789 h60
  text "Material" at 5406,1789 h60
  text "Thickness" at 6265.77,1789 h60
  text "Constant" at 6915.6,1789 h60
  text "Board Layer Stack" at 7485.46,1789 h60
  text "Top Overlay" at 4476.26,1669 h60
  text "Top Solder" at 4476.26,1549 h60
  text "Solder Resist" at 5406,1549 h60
  text "0.39mil" at 6265.77,1549 h60
  text "3.5" at 6915.6,1549 h60
  text "1" at 4066.34,1429 h60
  text "Top Layer" at 4476.26,1429 h60
  text "1.38mil" at 6265.77,1429 h60
  text "Dielectric 1" at 4476.26,1309 h60
  text "FR-4" at 5406,1309 h60
  text "59.06mil" at 6265.77,1309 h60
  text "4.8" at 6915.6,1309 h60
  text "2" at 4066.34,1189 h60
  text "Bottom Layer" at 4476.26,1189 h60
  text "1.38mil" at 6265.77,1189 h60
  text "Bottom Solder" at 4476.26,1069 h60
  text "Solder Resist" at 5406,1069 h60
  text "0.39mil" at 6265.77,1069 h60
  text "3.5" at 6915.6,1069 h60
  text "Bottom Overlay" at 4476.26,949 h60
  text "Total board thickness:" at 4066.34,829 h60
  text "62.60mil" at 6265.77,829 h60
Board_Outline:
  circle w10: c0,0 r1437.5
  circle w10: c0,0 r3437.5
Drill Drawing:
  circle w10: c4091.62,2857.83 r33.33
  lines w10: 4058.29,2291.17 4124.96,2291.17 4091.62,2224.5 4058.29,2291.17 ; 4058.29,2374.5 4091.62,2391.17 4124.96,2374.5 4108.29,2407.83 4124.96,2441.17 4091.62,2424.5 4058.29,2441.17 4074.96,2407.83 4058.29,2374.5 ; 4058.29,2524.5 4124.96,2524.5 4124.96,2591.17 4058.29,2591.17 4058.29,2524.5 ; 4058.29,2674.5 4058.29,2691.17 4074.96,2707.83 4058.29,2724.5 4058.29,2741.17 4074.96,2741.17 4091.62,2724.5 4108.29,2741.17 4124.96,2741.17 4124.96,2724.5 4108.29,2707.83 4124.96,2691.17 4124.96,2674.5 4108.29,2674.5 4091.62,2691.17 4074.96,2674.5 4058.29,2674.5 ; 4058.29,2991.17 4074.96,2991.17 4091.62,2974.5 4108.29,2991.17 4124.96,2991.17 4108.29,3007.83 4124.96,3024.5 4108.29,3024.5 4091.62,3041.17 4074.96,3024.5 4058.29,3024.5 4074.96,3007.83 4058.29,2991.17
  lines w15: 3998.5,2179.5 16812.92,2179.5 ; 3998.5,3079.5 16812.92,3079.5 ; 4549.38,2029.5 4549.38,3229.5 ; 5149.22,2029.5 5149.22,3229.5 ; 6298.88,2029.5 6298.88,3229.5 ; 6804.76,2029.5 6804.76,3229.5 ; 7538.56,2029.5 7538.56,3229.5 ; 9038.11,2029.5 9038.11,3229.5 ; 9627.96,2029.5 9627.96,3229.5 ; 10373.76,2029.5 10373.76,3229.5 ; 11023.58,2029.5 11023.58,3229.5 ; 11877.35,2029.5 11877.35,3229.5 ; 13210.96,2029.5 13210.96,3229.5 ; 14544.56,2029.5 14544.56,3229.5 ; 15410.32,2029.5 15410.32,3229.5 ; 3998.5,2029.5 16812.92,2029.5 16812.92,3229.5 3998.5,3229.5 3998.5,2029.5
  text "Symbol" at 4088.5,3124.5 h72
  text "Count" at 4594.38,3124.5 h72
  text "Hole Size" at 5194.22,3124.5 h72
  text "Plated" at 6343.88,3124.5 h72
  text "Hole Type" at 6849.76,3124.5 h72
  text "Drill Layer Pair" at 7583.56,3124.5 h72
  text "Via/Pad" at 9083.11,3124.5 h72
  text "Pad Shape" at 9672.96,3124.5 h72
  text "Template" at 10418.76,3124.5 h72
  text "Description" at 11068.58,3124.5 h72
  text "Hole Tolerance (+)" at 11922.35,3124.5 h72
  text "Hole Tolerance (-)" at 13255.96,3124.5 h72
  text "Hole Length" at 14589.56,3124.5 h72
  text "Routed Path Length" at 15455.32,3124.5 h72
  text "2" at 4594.38,2974.5 h60
  text "35.43mil (0.900mm)" at 5194.22,2974.5 h60
  text "PTH" at 6343.88,2974.5 h60
  text "Round" at 6849.76,2974.5 h60
  text "Top Layer - Bottom Layer" at 7583.56,2974.5 h60
  text "Pad" at 9083.11,2974.5 h60
  text "(Mixed)" at 9672.96,2974.5 h60
  text "(Mixed)" at 10418.76,2974.5 h60
  text "-" at 14589.56,2974.5 h60
  text "-" at 15455.32,2974.5 h60
  text "2" at 4594.38,2824.5 h60
  text "39.37mil (1.000mm)" at 5194.22,2824.5 h60
  text "PTH" at 6343.88,2824.5 h60
  text "Round" at 6849.76,2824.5 h60
  text "Top Layer - Bottom Layer" at 7583.56,2824.5 h60
  text "Pad" at 9083.11,2824.5 h60
  text "(Mixed)" at 9672.96,2824.5 h60
  text "(Mixed)" at 10418.76,2824.5 h60
  text "-" at 14589.56,2824.5 h60
  text "-" at 15455.32,2824.5 h60
  text "2" at 4594.38,2674.5 h60
  text "59.06mil (1.500mm)" at 5194.22,2674.5 h60
  text "NPTH" at 6343.88,2674.5 h60
  text "Round" at 6849.76,2674.5 h60
  text "Top Layer - Bottom Layer" at 7583.56,2674.5 h60
  text "Pad" at 9083.11,2674.5 h60
  text "(Mixed)" at 9672.96,2674.5 h60
  text "(Mixed)" at 10418.76,2674.5 h60
  text "-" at 14589.56,2674.5 h60
  text "-" at 15455.32,2674.5 h60
  text "4" at 4594.38,2524.5 h60
  text "196.85mil (5.000mm)" at 5194.22,2524.5 h60
  text "PTH" at 6343.88,2524.5 h60
  text "Round" at 6849.76,2524.5 h60
  text "Top Layer - Bottom Layer" at 7583.56,2524.5 h60
  text "Pad" at 9083.11,2524.5 h60
  text "Rounded" at 9672.96,2524.5 h60
  text "c872h500" at 10418.76,2524.5 h60
  text "-" at 14589.56,2524.5 h60
  text "-" at 15455.32,2524.5 h60
  text "6" at 4594.38,2374.5 h60
  text "47.24mil (1.200mm)" at 5194.22,2374.5 h60
  text "PTH" at 6343.88,2374.5 h60
  text "Round" at 6849.76,2374.5 h60
  text "Top Layer - Bottom Layer" at 7583.56,2374.5 h60
  text "Pad" at 9083.11,2374.5 h60
  text "(Mixed)" at 9672.96,2374.5 h60
  text "(Mixed)" at 10418.76,2374.5 h60
  text "-" at 14589.56,2374.5 h60
  text "-" at 15455.32,2374.5 h60
  text "193" at 4594.38,2224.5 h60
  text "11.81mil (0.300mm)" at 5194.22,2224.5 h60
  text "PTH" at 6343.88,2224.5 h60
  text "Round" at 6849.76,2224.5 h60
  text "Top Layer - Bottom Layer" at 7583.56,2224.5 h60
  text "Via" at 9083.11,2224.5 h60
  text "Rounded" at 9672.96,2224.5 h60
  text "(Mixed)" at 10418.76,2224.5 h60
  text "-" at 14589.56,2224.5 h60
  text "-" at 15455.32,2224.5 h60
  text "209 Total" at 4594.38,2074.5 h60

## Dimensions
-1437.5,0 to 1437.5,0 on Dimension
1437.5,0 to 3437.5,0 on Dimension
-3437.5,0 to 3437.5,0 on Dimension

## Text inside footprints (layer, text, board x,y; h text height)
C1: Top Overlay "+" at 1351.84,2226.81 h40 r270
C2: Top Overlay "+" at 646.84,2519.08 h40 r270
C8: Top Overlay "+" at -1224.16,2220.81 h40 r270
C9: Top Overlay "+" at -521.16,2512.07 h40 r270